# Altium PCB Mach_CB.PcbDoc
Units mm, origin at the board's own origin, x right, y up, seen from the top; angles counter-clockwise.
Board outline 63.75 x 77.09 mm, 2 copper layers (Top Layer, Bottom Layer); 29 components, 31 nets, 128 pads, 4 vias.
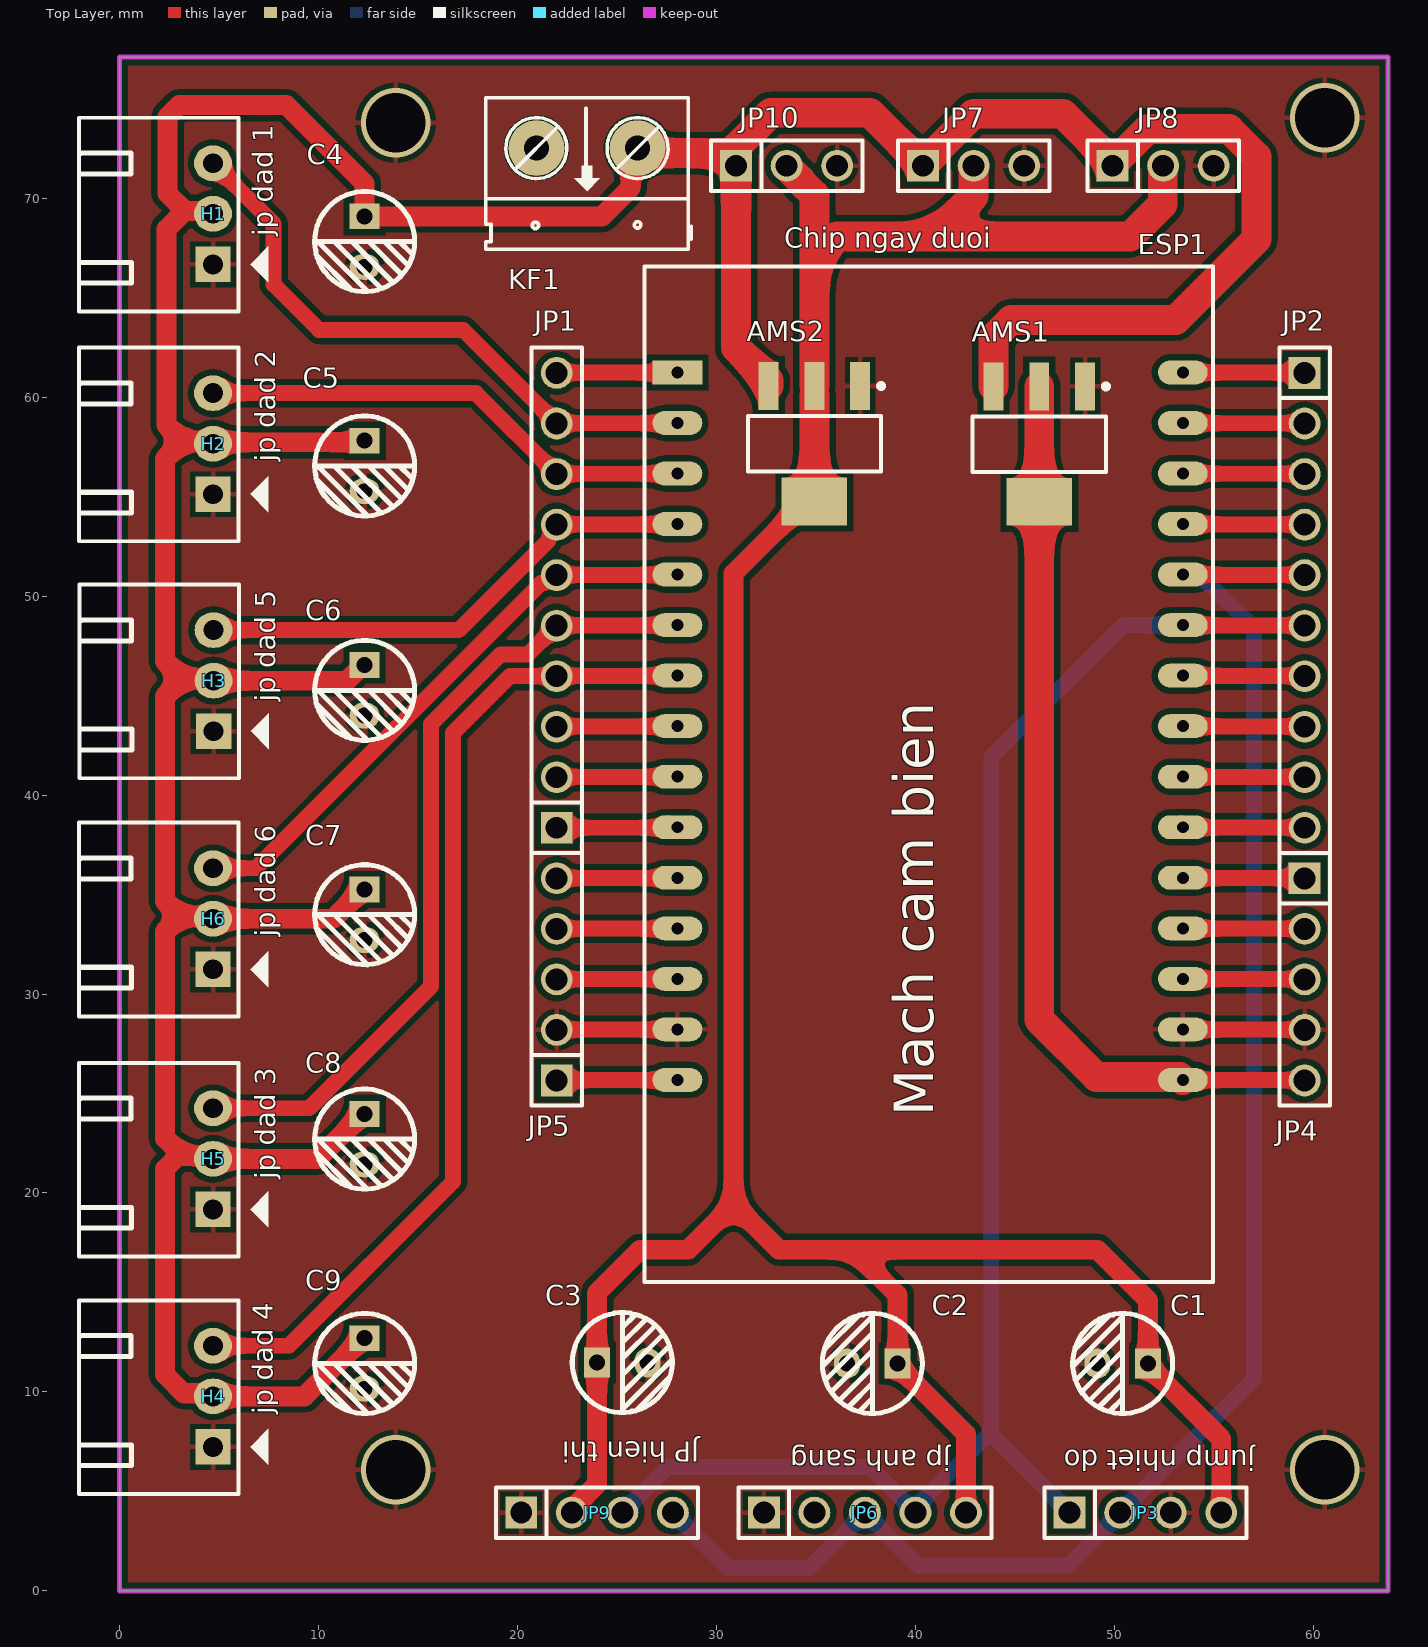
[diagram p0: Top Layer view]
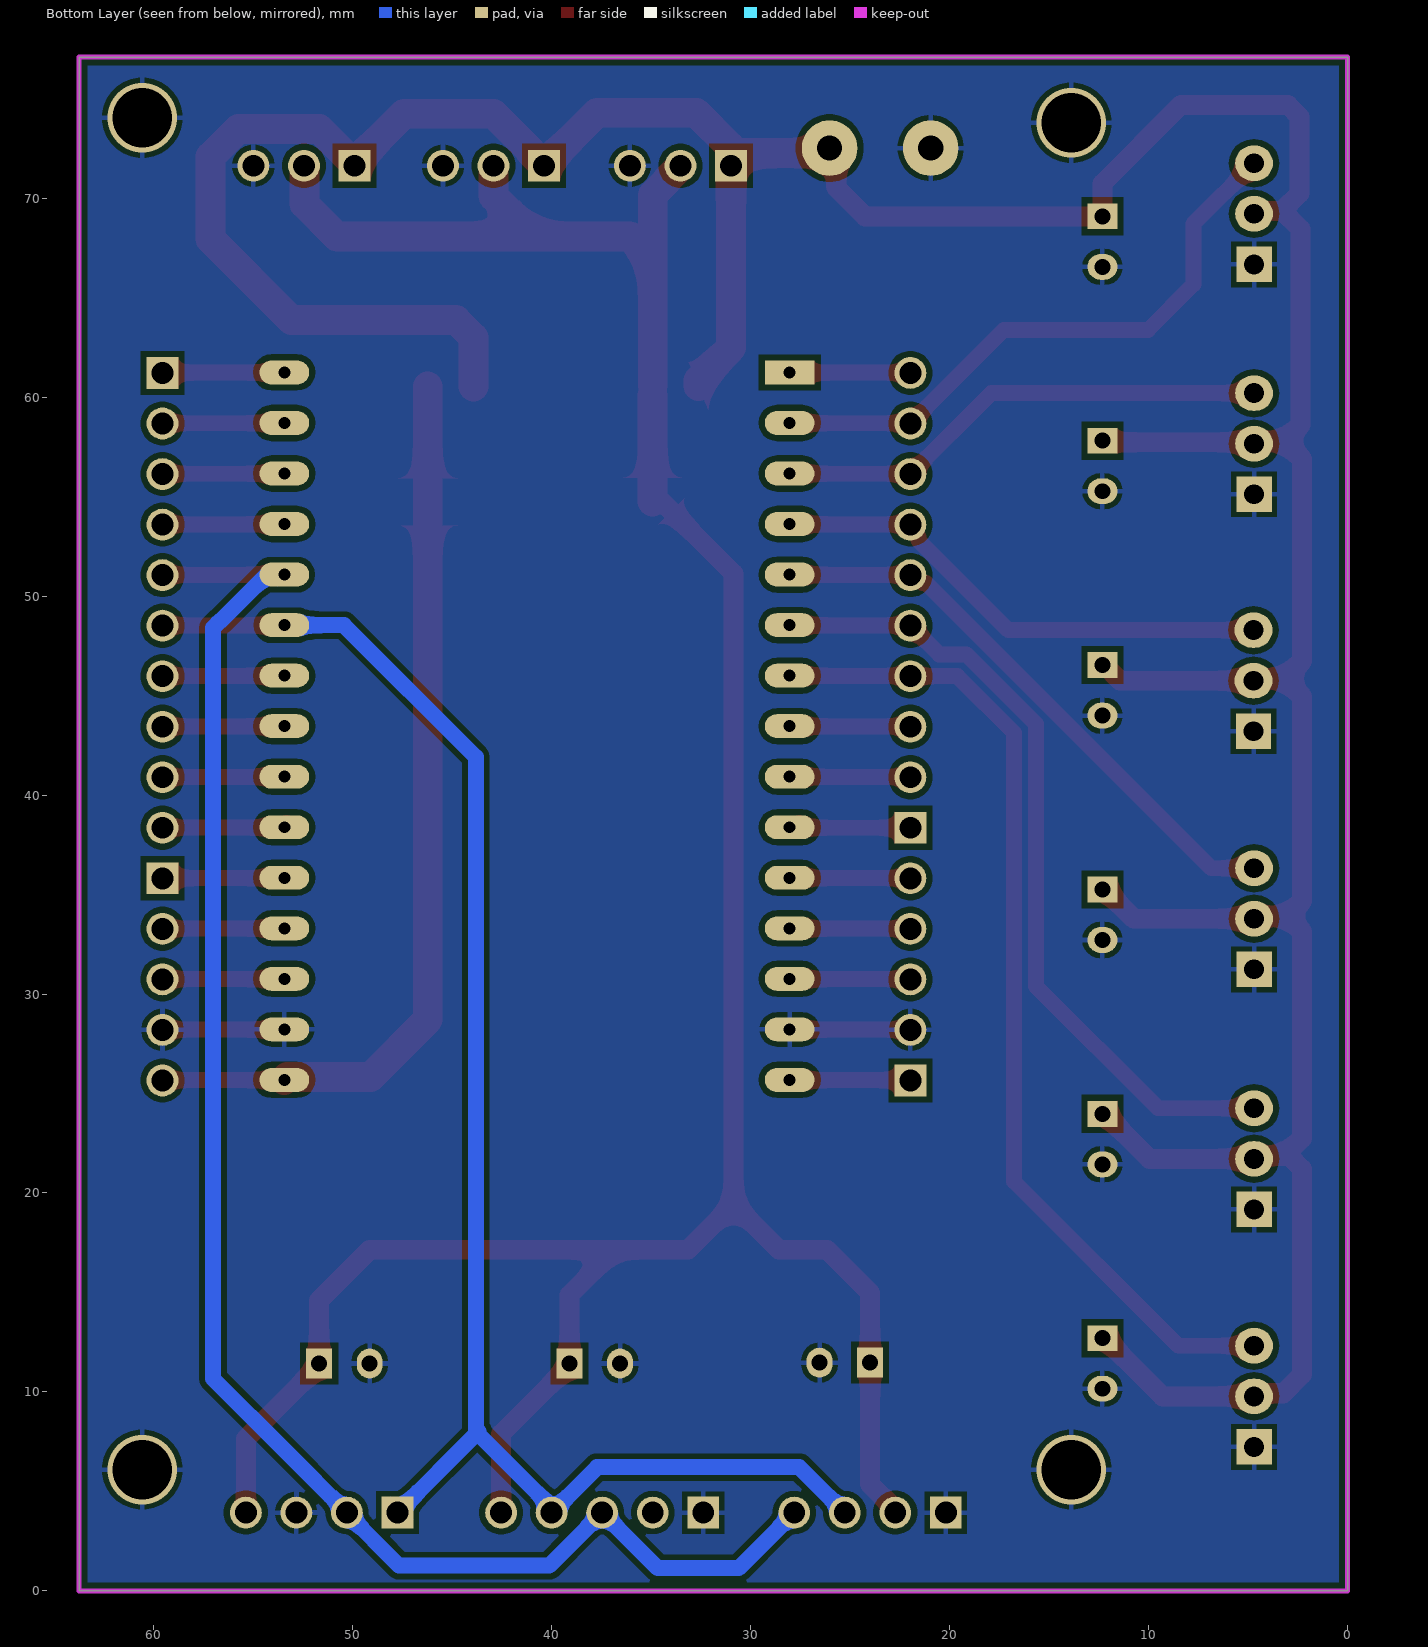
[diagram p1: Bottom Layer view, seen from below]
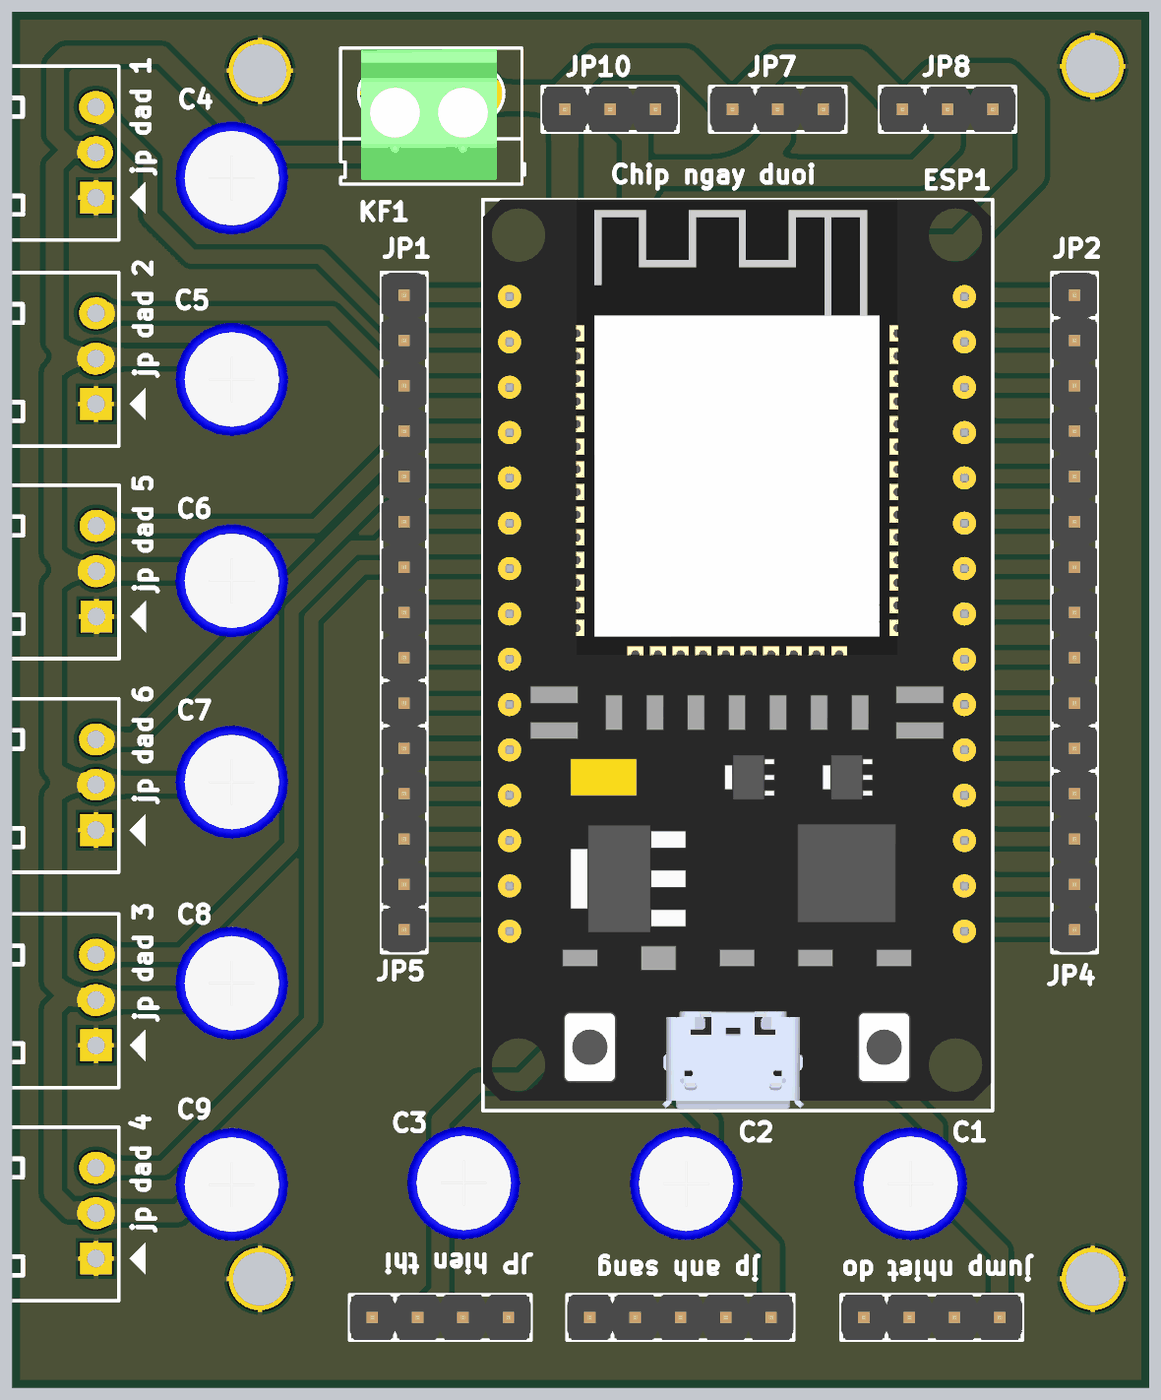
[diagram p2: 3D render of the assembled board from above, using the file's embedded part models]

## Layer stack, top to bottom
Top Solder: solder mask 0.0102, Solder Resist, Dk 3.5
Top Layer: signal copper 0.0356
Dielectric 1: dielectric 0.32, FR-4, Dk 4.8
Bottom Layer: signal copper 0.0356
Bottom Solder: solder mask 0.0102, Solder Resist, Dk 3.5

## Board outline
0,0 0,77.089 63.754,77.089 63.754,0

## Design rules (kind name [scope] priority, off if disabled: settings)
Clearance [All] p1: gap=0.3 ignorepadtopadclearanceinfootprint=FALSE
PolygonConnect [All] p1: connectstyle=Relief reliefconductorwidth=0.254 reliefentries=4 polygonreliefangle="90 Angle" airgapwidth=0.254
RoomDefinition Cam_bien_Sche [InComponentClass('Cam_bien_Sche')] p1: confinementstyle=ConfineIn formatcopy=TRUE lockcomponents=FALSE outline -15.494,-4.826 70.866,-4.826 70.866,82.169 -15.494,82.169
RoutingVias [All] p1: holewidth=0.711 width=1.27 viastyle="Through Hole" minholewidth=0.711 minwidth=1.27 maxholewidth=0.711 maxwidth=1.27
SolderMaskExpansion [All] p1: expansion=0.102 istentingtop=FALSE
Width 5V [InNet('5V')] p1: maxlimit=1.5 minlimit=0.5 preferedwidth=1
Width 3V3_2 [InNet('3V3_2')] p2: maxlimit=1.5 minlimit=0.5 preferedwidth=1
Width all [All] p3: maxlimit=1.5 minlimit=0.3 preferedwidth=0.5
Width 3V3_1 [InNet('3V3_1')] p4: maxlimit=1.5 minlimit=0.5 preferedwidth=1
30 further rules are at their usual default settings.

## Classes and differential pairs
component class Cam_bien_Sche: AMS1 AMS2 C1 C2 C3 C4 C5 C6 C7 C8 C9 ESP1 H1 H2 H3 H4 H5 H6 JP1 JP5 JP8 JP9 JP10 KF1

## Components (designator, comment, footprint, x,y, rotation, side; value= is the part's Value field where it differs from the comment)
AMS1 "AMS1117-3.3V" SOT223 46.228,57.637 r180 top value="AMS1117-3.3V SOT223"
AMS2 "AMS1117-3.3V" SOT223 34.925,57.658 r180 top value="AMS1117-3.3V SOT223"
C1 "220uF" "tu hoa 5mm" 50.419,11.43 r180 top
C2 "220uF" "tu hoa 5mm" 37.836,11.43 r180 top
C3 "220uF" "tu hoa 5mm" 25.268,11.474 r0 top
C4 "220uF" "tu hoa 5mm" 12.319,67.818 r270 top
C5 "220uF" "tu hoa 5mm" 12.319,56.54 r270 top
C6 "220uF" "tu hoa 5mm" 12.319,45.263 r270 top
C7 "220uF" "tu hoa 5mm" 12.319,33.985 r270 top
C8 "220uF" "tu hoa 5mm" 12.319,22.708 r270 top
C9 "220uF" "tu hoa 5mm" 12.319,11.43 r270 top
ESP1 "ESP32 DEVKIT" "ESP32 WROOM 32 KIT" 28.04,61.241 r0 top
H1 "jp dad 1" "Header 3P DC 2.54" 4.699,66.675 r180 top
H2 "jp dad 2" "Header 3P DC 2.54" 4.699,55.118 r180 top
H3 "jp dad 5" "Header 3P DC 2.54" 4.726,43.207 r180 top
H4 "jp dad 4" "Header 3P DC 2.54" 4.699,7.239 r180 top
H5 "jp dad 3" "Header 3P DC 2.54" 4.699,19.177 r180 top
H6 "jp dad 6" "Header 3P DC 2.54" 4.699,31.242 r180 top
JP1 "JP 1x10 2.54" "JP 1x10 DT" 21.971,38.354 r90 top
JP2 "JP 1x10 2.54" "JP 1x10 DT" 59.563,61.214 r270 top
JP3 "jump nhiet do" "JP 1x4 DT" 47.752,3.937 r0 top
JP4 "JP 1x5 2.54" "JP 1x5 DT" 59.563,35.814 r270 top
JP5 "JP 1x5 2.54" "JP 1x5 DT" 21.971,25.654 r90 top
JP6 "jp anh sang" "JP 1x5 DT" 32.385,3.937 r0 top
JP7 "JP them" "JP 1x3 DT" 40.386,71.628 r0 top
JP8 "JP them" "JP 1x3 DT" 49.911,71.628 r0 top
JP9 "JP hien thi" "JP 1x4 DT" 20.193,3.937 r0 top
JP10 "JP them" "JP 1x3 DT" 30.988,71.628 r0 top
KF1 "CON 2 KF301" "Con 2 KF301 5.08" 26.035,72.517 r180 top

## Footprints (in the part's own frame and the unit in brackets; to place one, negate y for a bottom-side part, rotate by r counter-clockwise, add the part's x,y. Pads: shape width x height; smd on the part's side, far side on the other; paste and mask are expansions set on the pad)
"Con 2 KF301 5.08" [mil]
  round 110 hole 50: 1(0,0) 2(200,0)
  silkscreen extent -106,-100 300,200, body extent -45,-97 255,190, height 335
"ESP32 WROOM 32 KIT" [mm]
  rect 2.5x1.2 hole 0.6: 1(0,0)
  oval 2.5x1.2 hole 0.6: 2(0,-2.54) 3(0,-5.08) 4(0,-7.62) 5(0,-10.16) 6(0,-12.7) 7(0,-15.24) 8(0,-17.78) 9(0,-20.32) 10(0,-22.86) 11(0,-25.4) 12(0,-27.94) 13(0,-30.48) 14(0,-33.02) 15(0,-35.56) 16(25.4,-35.56) 17(25.4,-33.02) 18(25.4,-30.48) 19(25.4,-27.94) 20(25.4,-25.4) 21(25.4,-22.86) 22(25.4,-20.32) 23(25.4,-17.78) 24(25.4,-15.24) 25(25.4,-12.7) 26(25.4,-10.16) 27(25.4,-7.62) 28(25.4,-5.08) 29(25.4,-2.54) 30(25.4,0)
  silkscreen extent -1.65,-45.72 26.92,5.33, body extent -1.65,-45.6 26.85,5.33, height 10.49
"Header 3P DC 2.54" [mil]
  rect 70x70 hole 39.37: 1(0,0)
  oval 75x70 hole 39.37: 2(0,-100) 3(0,-200)
  silkscreen extent -110,-290 265,93
"JP 1x3 DT" [mm]
  rect 1.6x1.6 hole 1.1: 1(0,0)
  round 1.6 hole 1.1: 2(2.54,0) 3(5.08,0)
  silkscreen extent -1.27,-1.27 6.35,1.27, body extent -1.27,-1.27 6.35,1.27, height 8.54
"JP 1x4 DT" [mm] "4 pins, 1 row, straight, gold plating"
  rect 1.6x1.6 hole 1.1: 1(0,0)
  round 1.6 hole 1.1: 2(2.54,0) 3(5.08,0) 4(7.62,0)
  silkscreen extent -1.27,-1.27 8.89,1.27, body extent -1.27,-1.27 8.89,1.27, height 8.54
"JP 1x5 DT" [mm] "5 pins, 1 row, straight, gold plating"
  rect 1.6x1.6 hole 1.1: 1(0,0)
  round 1.6 hole 1.1: 2(2.54,0) 3(5.08,0) 4(7.62,0) 5(10.16,0)
  silkscreen extent -1.27,-1.27 11.43,1.27, body extent -1.27,-1.27 11.43,1.27, height 8.54
"JP 1x10 DT" [mm] "10 pins, 1 row, straight, gold plating"
  rect 1.6x1.6 hole 1.1: 1(0,0)
  round 1.6 hole 1.1: 2(2.54,0) 3(5.08,0) 4(7.62,0) 5(10.16,0) 6(12.7,0) 7(15.24,0) 8(17.78,0) 9(20.32,0) 10(22.86,0)
  silkscreen extent -1.27,-1.27 24.13,1.27, body extent -1.27,-1.27 24.13,1.27, height 8.54
SOT223 [mm]
  rect 1x2.4 smd: 1(-2.3,-2.9) 2(0,-2.9) 3(2.3,-2.9)
  rect 3.3x2.4 smd: 4(0,2.9)
  silkscreen extent -3.48,-3.02 3.35,1.4, body extent -3.25,-3.56 3.25,3.4, height 1.68
"tu hoa 5mm" [mm]
  rect 1.3x1.5 hole 0.8: 1(-1.27,0)
  oval 1.3x1.5 hole 0.8: 2(1.27,0)
  silkscreen extent -2.51,-2.51 2.51,2.51, body extent -3.12,-3.18 3.23,3.18, height 14.55

## Part data
AMS1 AMS2: library part "AMS1117 SMD", "Dán", Chung_Loai=Dán, Don_Vi=Con, Ma_Hang=MH000596
C1 C2 C3 C4 C5 C6 C7 C8 C9: library part "Tu Hoa 220uF 10V 6x11", "Cắm", Chung_Loai=Cắm, Don_Vi=Con, Ma_Hang=MH004510, So_Chan=2, Ten_Linh_Kien="Tụ Hóa 220uF 10V 6x11MM"
ESP1: library part "ESP32 WROOM 32 KIT"
H1 H2 H3 H4 H5 H6: library part "Header 3P 2.54 Duc Cong", "Cắm", Chung_Loai=Cắm, Don_Vi=Con, Ma_Hang=MH001302, Ten_Linh_Kien="Header 3P XH2.54-3P Đực Cong"
JP1 JP2: library part "JP 1x10 2.54 Duc Thang", "Cắm", Chung_Loai=Cắm, Don_Vi=Con, Ma_Hang=MH000903, Ten_Linh_Kien="Jump Đơn Đực 2.54MM 1x40P Thẳng 11MM"
JP3 JP9: library part "JP 1x4 2.54 Duc Thang", "Cắm", Chung_Loai=Cắm, Don_Vi=Con, Ma_Hang=MH000903, Ten_Linh_Kien="Jump Đơn Đực 2.54MM 1x40P Thẳng 11MM"
JP4 JP5 JP6: library part "JP 1x5 2.54 Duc Thang", "Cắm", Chung_Loai=Cắm, Don_Vi=Con, Ma_Hang=MH000903, Ten_Linh_Kien="Jump Đơn Đực 2.54MM 1x40P Thẳng 11MM"
JP7 JP8 JP10: library part "JP 1x3 2.54 Duc Thang", "Cắm", Chung_Loai=Cắm, Don_Vi=Con, Ma_Hang=MH000903, Ten_Linh_Kien="Jump Đơn Đực 2.54MM 1x40P Thẳng 11MM"
KF1: "Cắm", Chung_Loai=Cắm, Don_Vi=Con, Ma_Hang=MH000987, Ten_Linh_Kien="CON 2 KF301-2P 5.08MM Xanh Dương"

## Via types
v1: diameter 3.5, hole 3, Top Layer to Bottom Layer, 4 vias

## Nets (pads, with @x,y where several pads share a name; then routed paths per layer and width w, separated by ;. In a path a pad name is that pad's centre, name@x,y a point inside that pad or via, vN(x,y) a via of type N, cw(c..) or ccw(c..) an arc to the next point about the centre after c; other vN are vias at no path point)
3V3_1: AMS1.2 AMS1.4 ESP1.16 JP4.5 | length 46.4
  Top Layer w0.8: ESP1.16 53.453,25.668 59.549,25.668 JP4.5
  Top Layer w1.5: AMS1.2 AMS1.4 46.228,28.702 49.099,25.831 53.29,25.831 ESP1.16
3V3_2: AMS2.2 AMS2.4 C1.1 C2.1 C3.1 JP3.4 JP6.5 JP7.2 JP8.2 JP9.2 JP10.2 | length 150.1
  Top Layer w1: JP9.2 22.733,4.099 23.998,5.365 C3.1 23.998,14.981 26.162,17.145 28.575,17.145 30.861,19.431 ; AMS2.4 34.475,54.758 33.775,54.058 33.775,54.051 30.861,51.137 30.861,19.431 ; JP6.5 42.545,7.891 39.106,11.33 C2.1 39.106,14.869 36.83,17.145 ; JP3.4 55.372,7.647 51.689,11.33 C1.1 51.689,14.605 49.149,17.145 36.83,17.145 ; 30.861,19.431 33.147,17.145 36.83,17.145
  Top Layer w1.5: JP10.2 33.528,71.601 34.218,70.911 34.218,70.862 34.925,70.155 34.925,66.929 ; AMS2.4 34.929,54.762 AMS2.2@34.929,60.108 ; AMS2.2 34.925,66.929 ; JP7.2 42.926,70.104 40.894,68.072 ; JP8.2 52.432,71.609 52.432,69.704 50.8,68.072 40.894,68.072 ; 34.925,66.929 36.068,68.072 40.894,68.072
5V: AMS1.3 AMS2.3 C4.1 C5.1 C6.1 C7.1 C8.1 C9.1 H1.2 H2.2 H3.2 H4.2 H5.2 H6.2 JP7.1 JP8.1 JP10.1 KF1.1 | length 217.7
  Top Layer w1: H1.2 4.55,69.364 3.28,69.364 ; C9.1 12.219,12.7 9.298,9.779 H4.2 4.55,9.928 3.231,9.928 2.286,10.873 2.286,21.209 2.943,21.866 3.153,21.866 ; C8.1 12.219,23.978 9.958,21.717 H5.2 4.55,21.866 3.153,21.866 ; C7.1 12.219,35.255 10.746,33.782 H6.2 4.572,33.909 3.048,33.909 ; C6.1 12.219,46.533 11.433,45.747 H3.2 4.625,45.847 3.175,45.847 ; C5.1 12.243,57.734 4.775,57.734 H2.2 4.572,57.785 3.175,57.785 ; KF1.1 25.692,72.174 25.692,70.523 24.257,69.088 C4.1 12.319,70.739 8.382,74.676 2.999,74.676 2.413,74.09 2.413,70.231 3.28,69.364 ; 3.048,33.909 2.286,33.147 2.286,22.733 3.153,21.866 ; 3.048,33.909 2.286,34.671 2.286,44.958 3.175,45.847 ; 3.175,45.847 2.286,46.736 2.286,56.896 3.175,57.785 ; 3.175,57.785 2.369,58.591 2.369,68.453 3.28,69.364
  Top Layer w1.5: KF1.1@26.986,72.263 30.353,72.263 JP10.1 30.988,62.484 32.625,60.847 AMS2.3 ; 31.038,72.599 32.734,74.295 37.719,74.295 JP7.1 41.076,72.318 41.076,72.394 42.926,74.244 47.422,74.244 JP8.1@49.861,71.805 ; AMS1.3 43.928,63.002 44.807,63.881 53.086,63.881 57.144,67.939 57.144,72.091 55.757,73.478 51.685,73.478 49.961,71.754 49.961,71.678 JP8.1
D2: ESP1.19 JP4.2 | length 6.1
  Top Layer w0.8: ESP1.19 53.453,33.288 59.549,33.288 JP4.2
D4: ESP1.20 JP4.1 | length 6.1
  Top Layer w0.8: ESP1.20 53.453,35.828 59.549,35.828 JP4.1
D5: ESP1.23 JP2.8 | length 6.2
  Top Layer w0.8: ESP1.23 53.621,43.461 53.721,43.561 53.834,43.448 59.549,43.448 JP2.8
D12: ESP1.12 JP5.4 | length 6.1
  Top Layer w0.8: JP5.4 21.985,33.288 28.026,33.288 ESP1.12
D13: ESP1.13 JP5.3 | length 6.1
  Top Layer w0.8: JP5.3 21.985,30.748 28.026,30.748 ESP1.13
D14: ESP1.11 JP5.5 | length 6.1
  Top Layer w0.8: JP5.5 21.985,35.828 28.026,35.828 ESP1.11
D15: ESP1.18 JP4.3 | length 6.1
  Top Layer w0.8: ESP1.18 53.453,30.748 59.549,30.748 JP4.3
D18: ESP1.24 JP2.7 | length 6.1
  Top Layer w0.8: ESP1.24 53.453,45.988 59.549,45.988 JP2.7
D22: ESP1.29 JP2.2 | length 6.1
  Top Layer w0.8: ESP1.29 53.453,58.688 59.549,58.688 JP2.2
D23: ESP1.30 JP2.1 | length 6.1
  Top Layer w0.8: ESP1.30 53.453,61.228 59.549,61.228 JP2.1
D25: ESP1.8 JP1.3 | length 6.1
  Top Layer w0.8: JP1.3 21.985,43.448 28.026,43.448 ESP1.8
D26: ESP1.9 JP1.2 | length 6.1
  Top Layer w0.8: JP1.2 21.985,40.908 28.026,40.908 ESP1.9
D27: ESP1.10 JP1.1 | length 6.3
  Top Layer w0.8: JP1.1 27.305,38.354 27.559,38.608 27.559,38.566 27.744,38.381 ESP1.10
D32: ESP1.6 H5.3 JP1.5 | length 41.1
  Top Layer w0.8: H5.3 9.525,24.257 15.664,30.396 15.664,43.579 19.159,47.074 20.531,47.074 JP1.5 ; JP1.5@21.971,48.528 28.026,48.528 ESP1.6
D33: ESP1.7 H4.3 JP1.4 | length 50.5
  Top Layer w0.8: H4.3 8.509,12.319 16.764,20.574 16.764,43.123 19.615,45.974 JP1.4 ; JP1.4@21.985,45.988 28.026,45.988 ESP1.7
D34: ESP1.4 H3.3 JP1.7 | length 25.7
  Top Layer w0.8: H3.3 17.045,48.287 21.571,52.813 21.571,52.978 21.971,53.378 JP1.7 21.985,53.608 28.026,53.608 ESP1.4
D35: ESP1.5 H6.3 JP1.6 | length 29.4
  Top Layer w0.8: H6.3 6.852,36.322 21.184,50.654 21.355,50.654 21.755,51.054 JP1.6 ; JP1.6@21.985,51.068 28.026,51.068 ESP1.5
EN: ESP1.1 JP1.10 | length 6.1
  Top Layer w0.8: JP1.10 21.985,61.228 28.026,61.228 ESP1.1
GND: AMS1.1 AMS2.1 C1.2 C2.2 C3.2 C4.2 C5.2 C6.2 C7.2 C8.2 C9.2 ESP1.14 ESP1.17 H1.1 H2.1 H3.1 H4.1 H5.1 H6.1 JP3.3 JP4.4 JP5.2 JP6.1 JP7.3 JP8.3 JP9.1 JP10.3 KF1.2 | length 12.2
  Top Layer w0.8: JP5.2 21.985,28.208 28.026,28.208 ESP1.14 ; ESP1.17 53.453,28.208 59.549,28.208 JP4.4
  other v1: 13.887,6.096 60.579,6.096 13.887,73.787 60.579,74.041
RX0: ESP1.27 JP2.4 | length 6.1
  Top Layer w0.8: ESP1.27 53.453,53.608 59.549,53.608 JP2.4
RX2: ESP1.21 JP2.10 | length 6.4
  Top Layer w0.8: ESP1.21@53.34,38.608 53.44,38.508 ESP1.21 53.453,38.368 59.549,38.368 JP2.10
SCL: ESP1.25 JP2.6 JP3.1 JP6.4 JP9.3 | length 81.4
  Top Layer w0.8: ESP1.25@53.453,48.528 59.549,48.528 JP2.6
  Top Layer w1: ESP1.25@52.79,48.541 ESP1.25 ; JP2.6 59.725,48.514 JP2.6@59.852,48.387
  Bottom Layer w0.8: JP9.3 27.559,6.223 37.719,6.223 JP6.4 40.005,4.153 40.405,4.553 40.405,4.591 43.752,7.938 ; JP3.1 43.688,8.001 43.815,8.128 43.815,41.91 50.446,48.541 ESP1.25
SDA: ESP1.26 JP2.5 JP3.2 JP6.3 JP9.4 | length 85.7
  Top Layer w0.8: ESP1.26@53.453,51.068 59.549,51.068 JP2.5
  Top Layer w1: ESP1.26@52.79,51.081 ESP1.26
  Bottom Layer w0.8: JP9.4 30.607,1.143 34.671,1.143 JP6.3 40.132,1.27 47.675,1.27 50.292,3.887 JP3.2 53.34,6.985 57.023,10.668 57.023,48.408 56.789,48.642 ; ESP1.26 53.517,51.004 54.395,51.004 56.642,48.758 56.687,48.744 56.789,48.642
TX0: ESP1.28 JP2.3 | length 6.1
  Top Layer w0.8: ESP1.28 53.453,56.148 59.549,56.148 JP2.3
TX2: ESP1.22 JP2.9 | length 6.1
  Top Layer w0.8: ESP1.22 53.453,40.908 59.549,40.908 JP2.9
VIN: ESP1.15 JP5.1 | length 6.1
  Top Layer w0.8: JP5.1 21.985,25.668 28.026,25.668 ESP1.15
VN: ESP1.3 H2.3 JP1.8 | length 25
  Top Layer w0.8: H2.3 17.907,60.198 JP1.8 21.985,56.148 28.026,56.148 ESP1.3
VP: ESP1.2 H1.3 JP1.9 | length 30.8
  Top Layer w0.8: H1.3 7.747,68.707 7.747,65.659 10.033,63.373 17.272,63.373 JP1.9 21.985,58.688 28.026,58.688 ESP1.2
  Bottom Layer w0.8: JP1.9@21.818,58.827 JP1.9
pads on no net: JP6.2

## Polygon pours and split planes (outlines as drawn)
GND on Bottom Layer "NONET_L-01_P-001" (solid, pour order 4): 0,77.089 63.754,77.089 63.754,0 0,0
no net on Bottom Layer "NONET_L-01_P-001" (solid, pour order 1): 66.04,85.09 66.04,0 66.04,85.09
GND on Top Layer "NONET_L-01_P-001" (solid, pour order 3): 0,77.089 62.092,77.089 63.754,78.751 63.754,0.001 0,0

## Keep-outs
Keep-Out Layer:
  the board outline again, w0.254

## Silkscreen, mask and mechanical layers (free items; w line width, h text height)
Top Overlay:
  text "Chip ngay duoi" at 33.401,67.516 h1
  text "Mach cam bien" at 40.902,23.868 h2 r90